# EAGLE board attributes_odd (EAGLE 9.6.2)

No outline drawn. Coordinates in mm, seen from the top.
Copper layers used: 

## Placement (x,y rotation side)
C1  [p]  2,2 0 top
R1  <1k>  [p]  0,0 0 top
R1  2k  [p]  1,1 0 top

## Library data of the parts
C1 R1 R1 = l